# Altium PCB photo_frame-v1.0.PcbDoc (part 1 of 5)
Units mil, origin at the board's own origin, x right, y up, seen from the top; angles counter-clockwise.
Board outline 27716.54 x 14566.93 mil, 2 copper layers (Top Layer, Bottom Layer), stack 61.811 mil thick; 261 components, 231 nets, 1061 pads, 959 vias.
Unrouted connection lines stored in the file: 10.
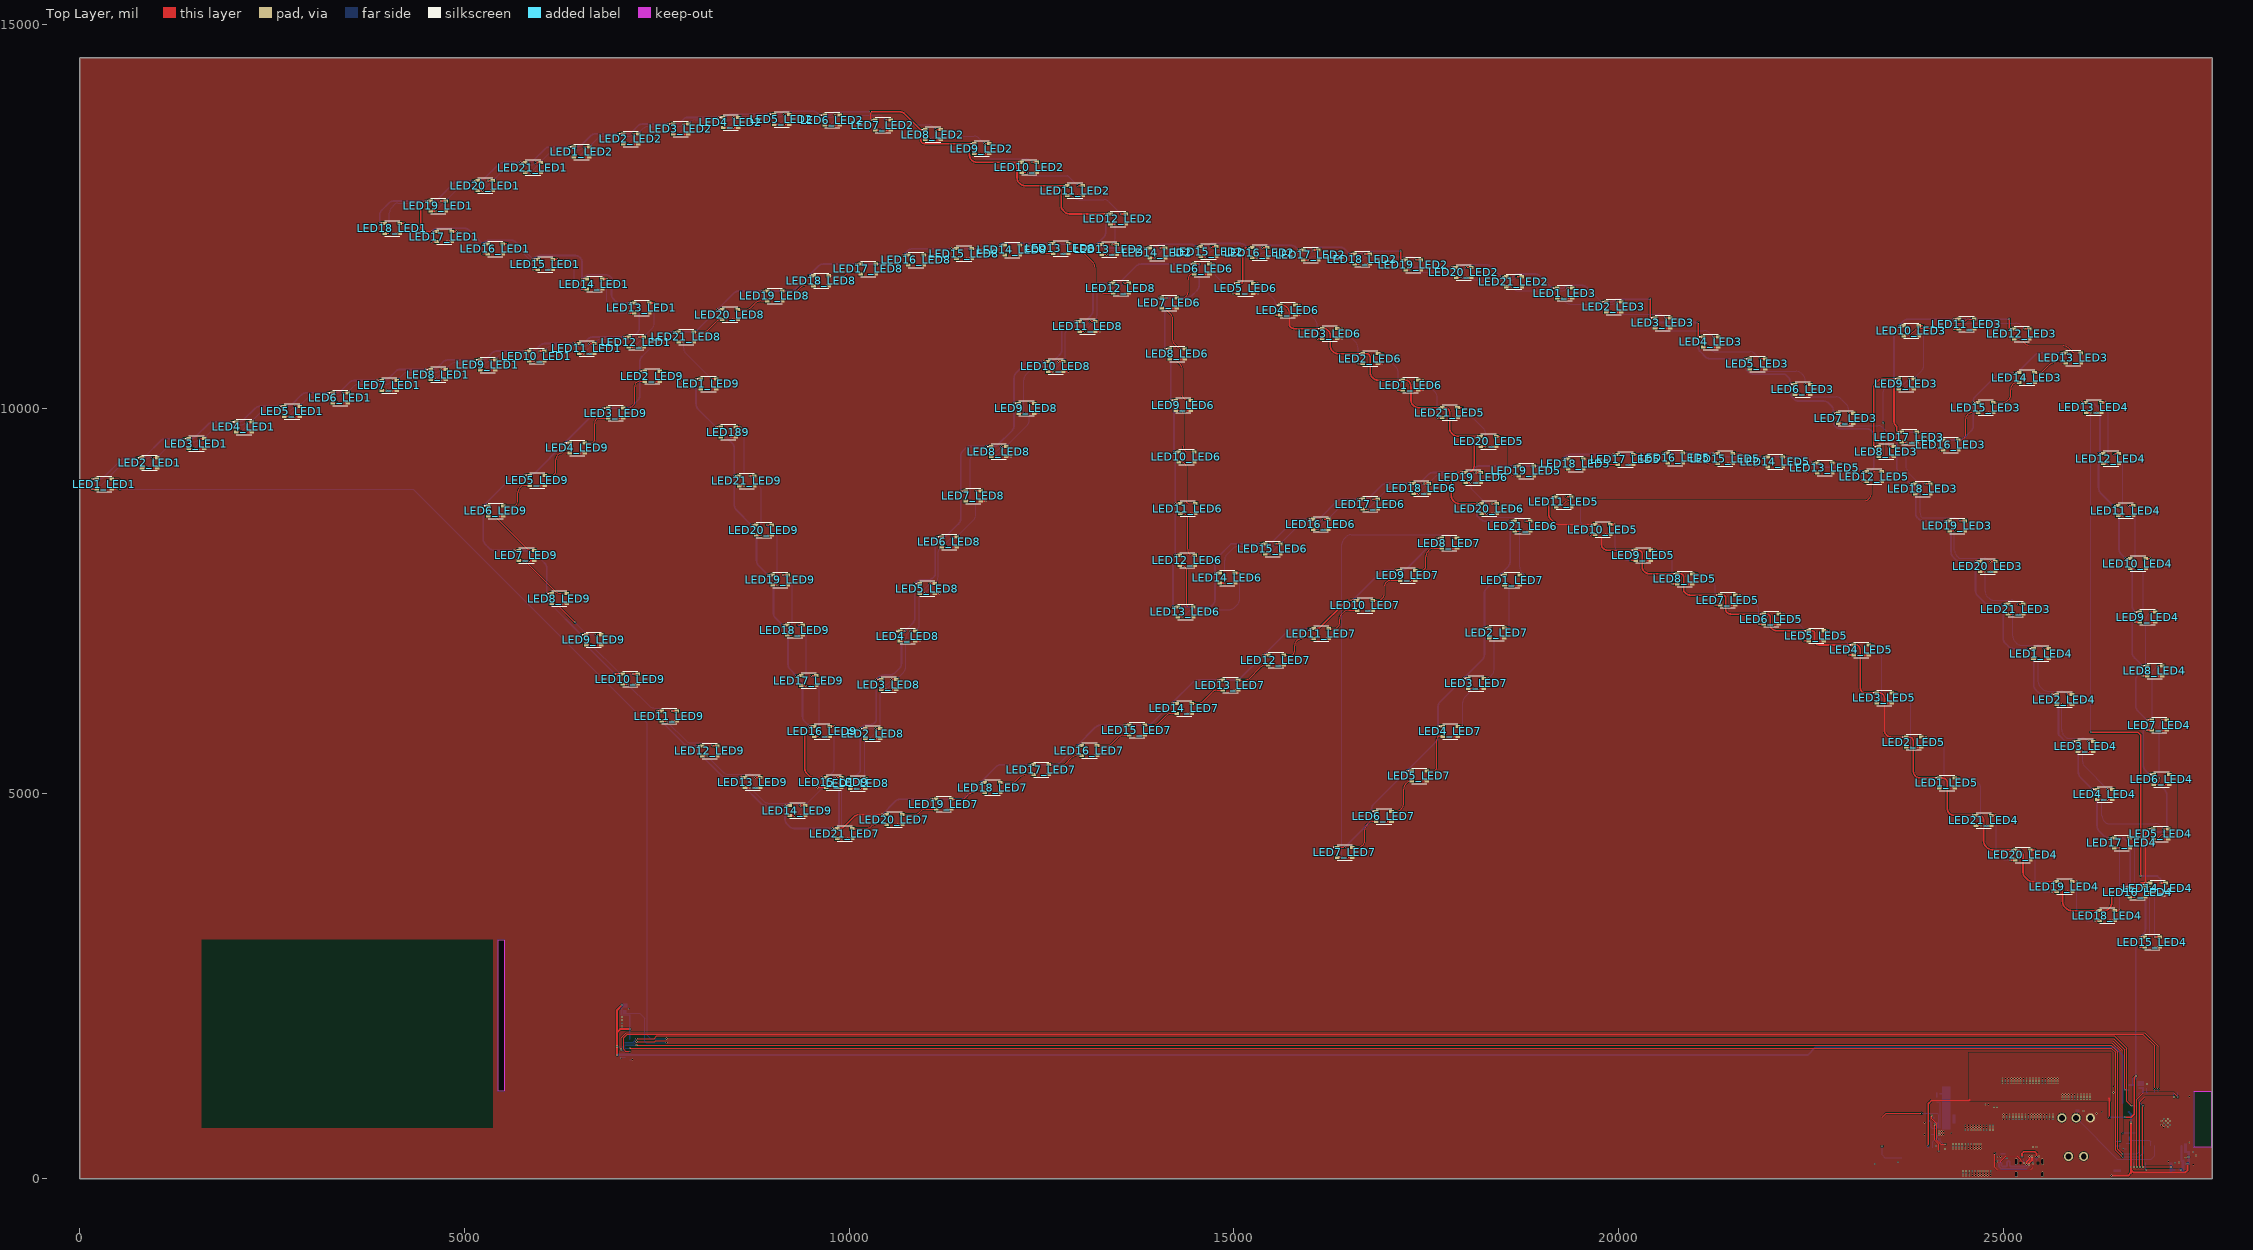
[diagram p0: Top Layer view]
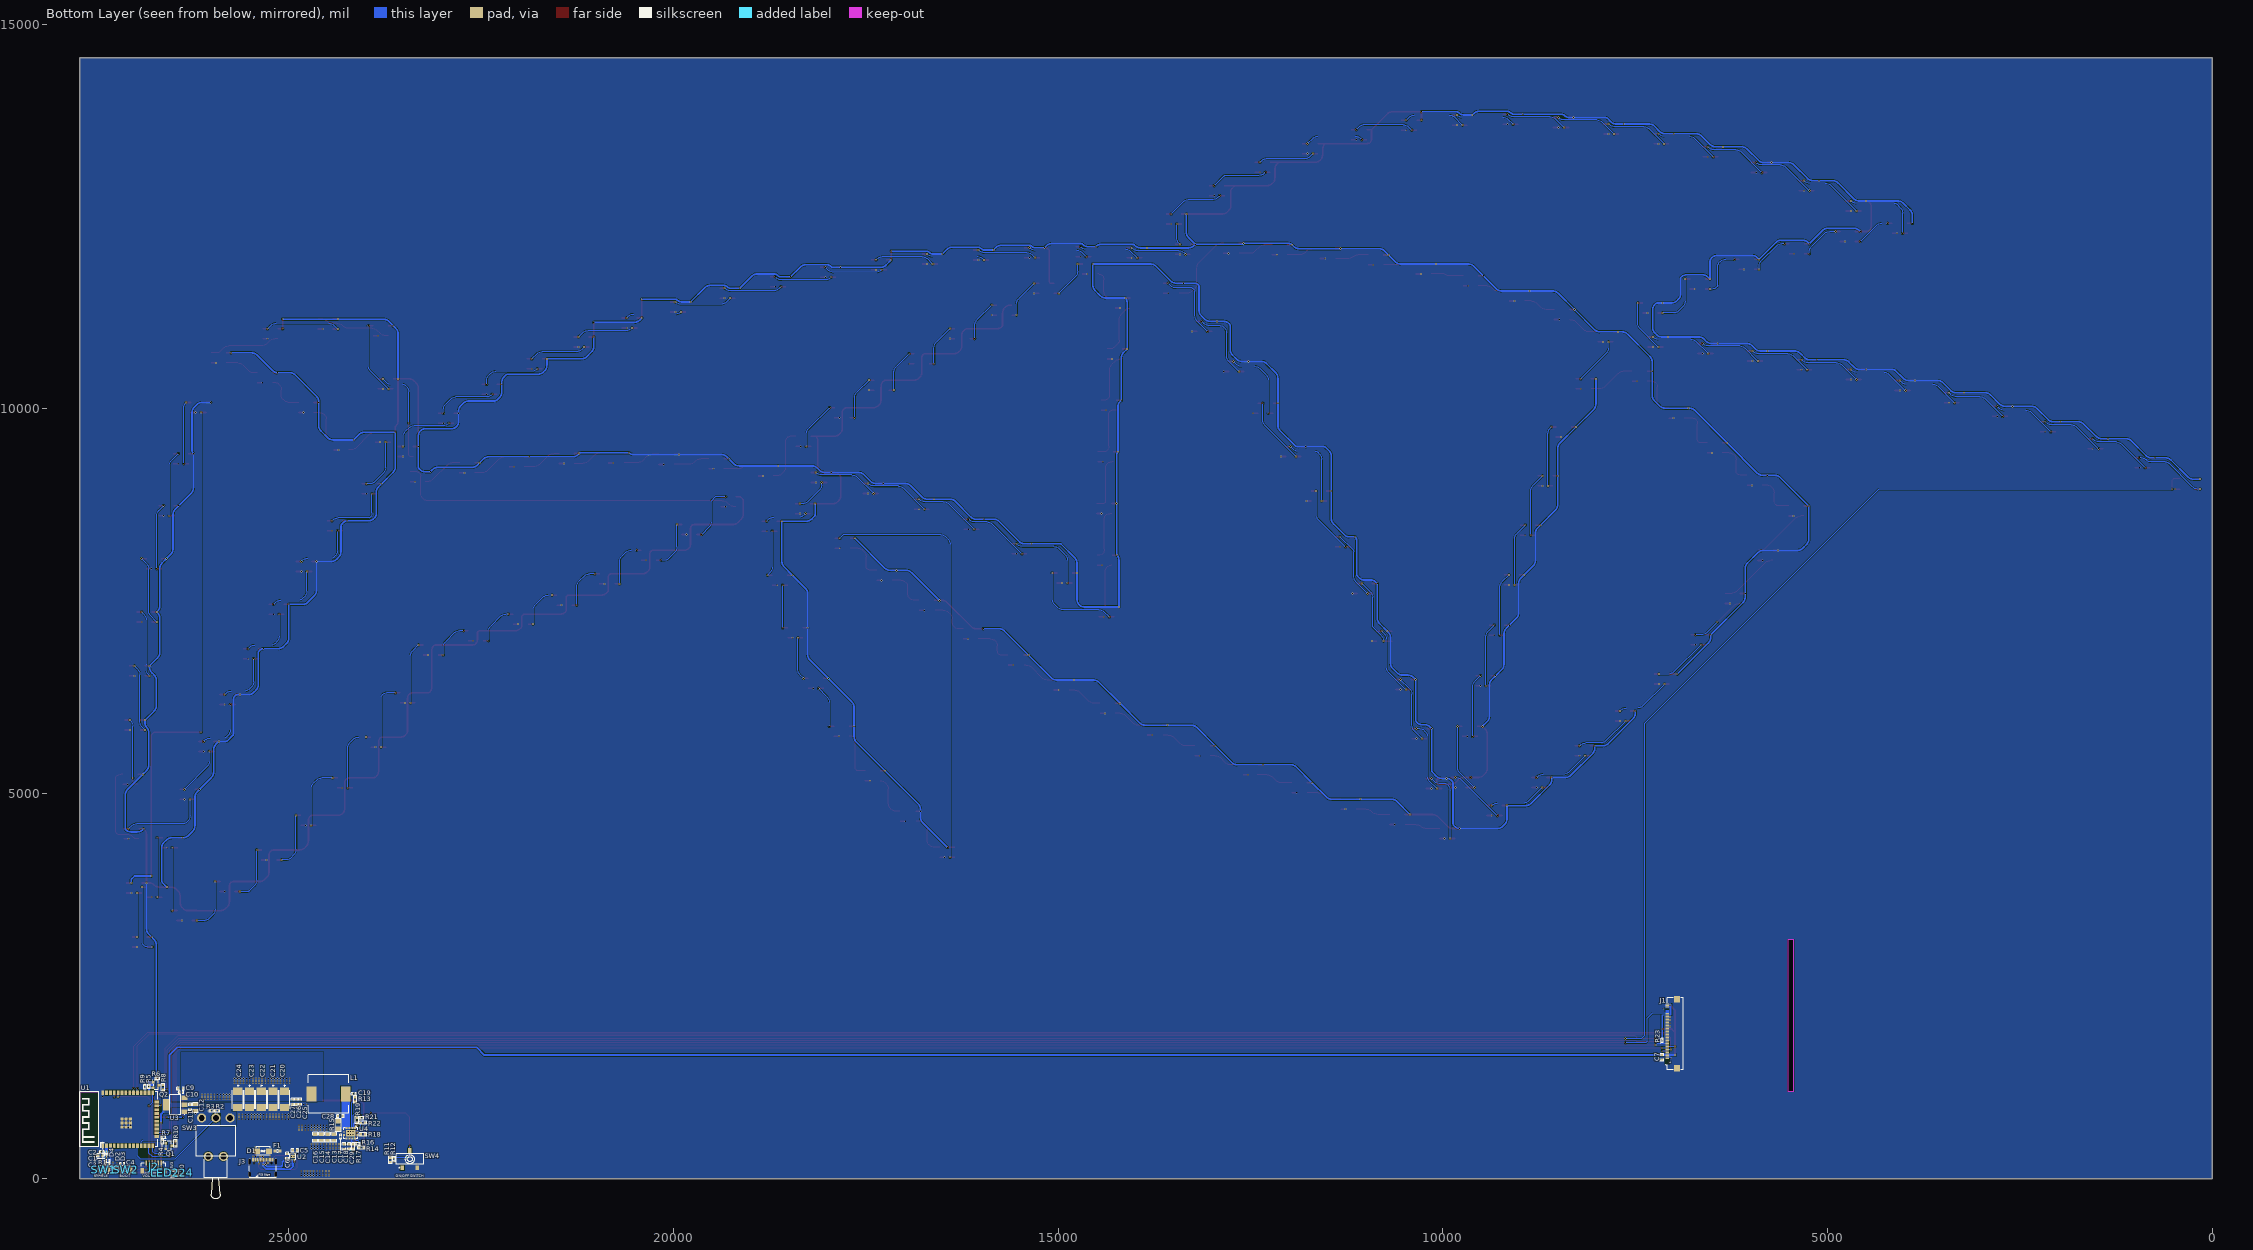
[diagram p1: Bottom Layer view, seen from below]
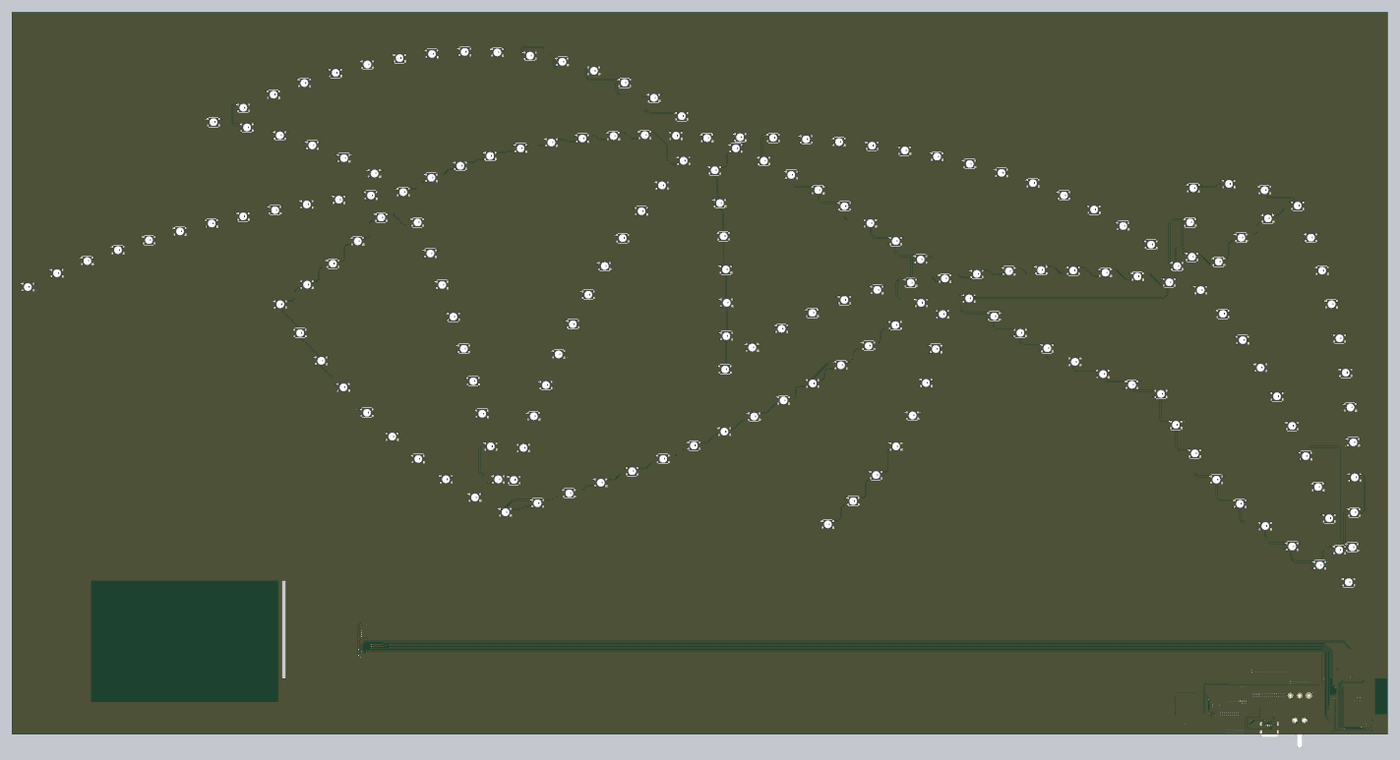
[diagram p5: 3D render of the assembled board from above, using the file's embedded part models]
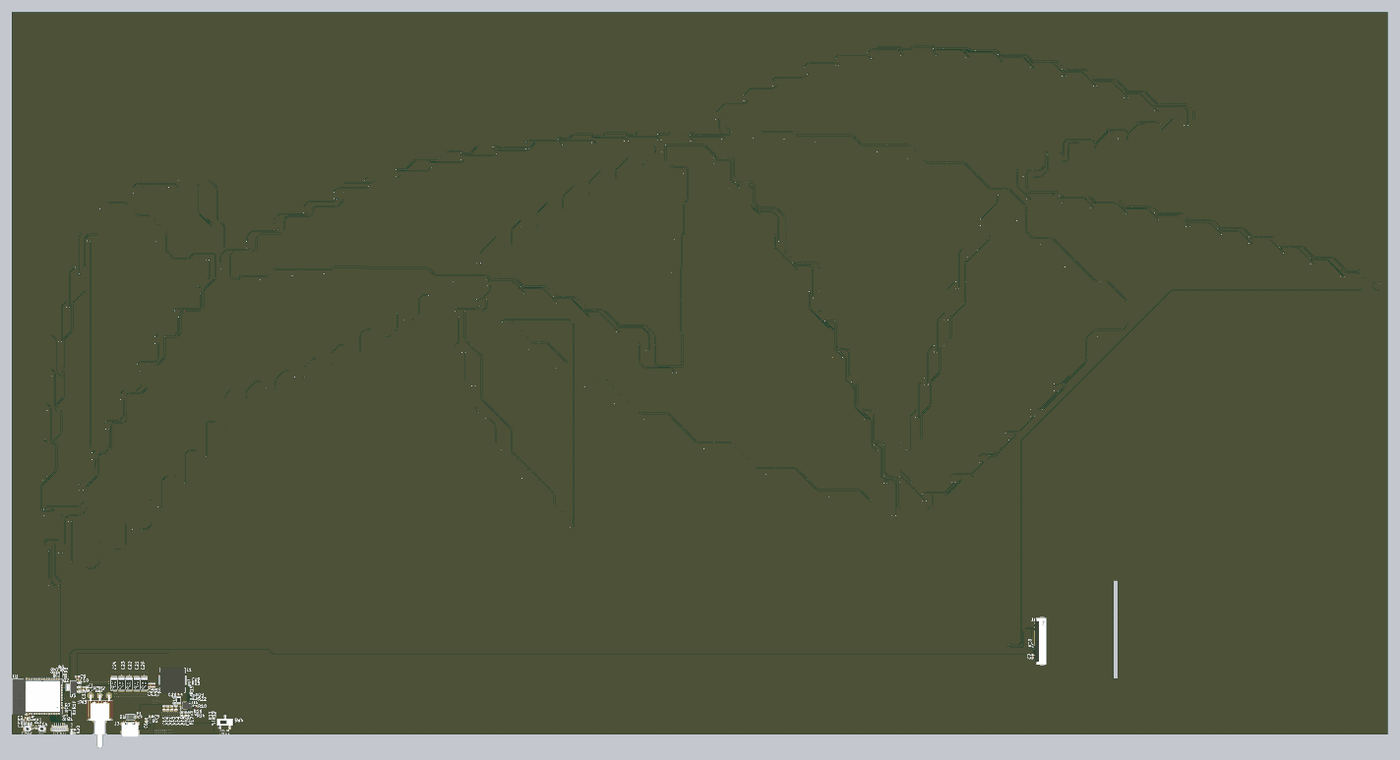
[diagram p6: 3D render of the assembled board from below, using the file's embedded part models]

## Layer stack, top to bottom
Top Solder: solder mask 0.3937, Solder Resist, Dk 3.5
Top Layer: signal copper 1.378
Dielectric 1: dielectric 59.0551, FR-4, Dk 4.8
Bottom Layer: signal copper 1.378
Bottom Solder: solder mask 0.3937, Solder Resist, Dk 3.5

## Board outline
0,0 27716.54,0 27716.54,14566.93 0,14566.93
cut-out: 5440.02,1133.7 5440.02,3102.2 5518.76,3102.2 5518.76,1133.7

## Design rules (kind name [scope] priority, off if disabled: settings)
BoardOutlineClearance [All] p1: gap=0 ignorepadtopadclearanceinfootprint=FALSE except(10: Poly-OutlineEdge)
Clearance [All] p1: gap=7 ignorepadtopadclearanceinfootprint=FALSE except(0: Arc-Hole Track-Hole SMDPad-THPad SMDPad-Hole THPad-Hole Via-Hole Fill-Hole Poly-Hole Region-Hole Text-Hole; 4: Arc-SMDPad Track-SMDPad SMDPad-SMDPad)
DiffPairsRouting [InDifferentialPairClass('USB_DIFF_Lines')] p1: maxlimit=8 minlimit=8 mostfreqgap=8 toplayer_minwidth=8 toplayer_maxwidth=24 toplayer_prefwidth=24 bottomlayer_minwidth=8 bottomlayer_maxwidth=24 bottomlayer_prefwidth=24 impedanceprofiledriven=TRUE impedanceprofileid={633D5728-49A2-474F-B205-5C5DE7246109} impedanceprofilevalue=90.000000 maxuncoupledlength=500
HoleSize [All] p1: absolutevalues=TRUE maxlimit=1000 minlimit=1 maxpercent=80.000 minpercent=20.000
HoleToHoleClearance [All] p1: gap=0 allowstackedmicrovias=TRUE
MatchedLengths "Schematic Matched Net Lengths_1" [InNetClass('USB_DIFF')] p1: tolerance=20 checknetsindiffpair=TRUE checkdiffpairvsdiffpair=FALSE checkxsignals=FALSE checkothers=FALSE
MaxMinImpedance "Schematic Impedance Constraint_1" [InNetClass('USB_DIFF')] p1: minimum=85.00 maximum=95.00
MinimumSolderMaskSliver [All] p1: minsoldermaskwidth=0
PlaneConnect [All] p1: planeconnectstyle=Direct reliefexpansion=20 reliefentries=4 reliefconductorwidth=10 reliefairgap=10
PolygonConnect [All] p1: connectstyle=Direct reliefconductorwidth=10 reliefentries=4 polygonreliefangle="90 Angle" airgapwidth=10
RoutingVias [All] p1: holewidth=11.81 width=23.62 viastyle="Through Hole" minholewidth=11.81 minwidth=23.62 maxholewidth=11.81 maxwidth=23.62
SilkToSilkClearance [All] p1: silktosilkclearance=0
SilkToSolderMaskClearance [IsPad] p1: minsilkscreentomaskgap=0 clearancetoexposedcopper=TRUE
SolderMaskExpansion [All] p1: expansion=4 istentingtop=FALSE
UnRoutedNet [All] p1: checkbadconnections=TRUE
Width [All] p1: maxlimit=100 minlimit=5 preferedwidth=22
22 further rules are at their usual default settings.

## Classes and differential pairs
differential pair class USB_DIFF_Lines: USB_D
channel class LED_Sheet: LED1 LED2 LED3 LED4 LED5 LED6 LED7 LED8 LED9
net class USB_DIFF: USB_D_N USB_D_P
component class U_Power_Sheet: C5 C6 C9 C10 C11 C12 C13 C14 C15 C16 C17 C18 C19 C20 C21 C22 C23 C24 C25 C26 C27 C28 C29 D1 F1 J3 L1 LED224 R11 R12 R13 R14 R15 R16 R17 R18 R19 R20 R21 R22 SW4 U2 U3 U4
component class U_Controller_Sheet: C1 C2 C3 C4 C7 D2 D3 D4 J1 J2 Q1 Q2 R1 R2 R3 R4 R5 R6 R7 R8 R9 R10 R23 SW1 SW2 SW3 U1
component class Top_Sheet: LED189
component class LED9: LED1_LED9 LED2_LED9 LED3_LED9 LED4_LED9 LED5_LED9 LED6_LED9 LED7_LED9 LED8_LED9 LED9_LED9 LED10_LED9 LED11_LED9 LED12_LED9 LED13_LED9 LED14_LED9 LED15_LED9 LED16_LED9 LED17_LED9 LED18_LED9 LED19_LED9 LED20_LED9 LED21_LED9
component class LED8: LED1_LED8 LED2_LED8 LED3_LED8 LED4_LED8 LED5_LED8 LED6_LED8 LED7_LED8 LED8_LED8 LED9_LED8 LED10_LED8 LED11_LED8 LED12_LED8 LED13_LED8 LED14_LED8 LED15_LED8 LED16_LED8 LED17_LED8 LED18_LED8 LED19_LED8 LED20_LED8 LED21_LED8
component class LED7: LED1_LED7 LED2_LED7 LED3_LED7 LED4_LED7 LED5_LED7 LED6_LED7 LED7_LED7 LED8_LED7 LED9_LED7 LED10_LED7 LED11_LED7 LED12_LED7 LED13_LED7 LED14_LED7 LED15_LED7 LED16_LED7 LED17_LED7 LED18_LED7 LED19_LED7 LED20_LED7 LED21_LED7
component class LED6: LED1_LED6 LED2_LED6 LED3_LED6 LED4_LED6 LED5_LED6 LED6_LED6 LED7_LED6 LED8_LED6 LED9_LED6 LED10_LED6 LED11_LED6 LED12_LED6 LED13_LED6 LED14_LED6 LED15_LED6 LED16_LED6 LED17_LED6 LED18_LED6 LED19_LED6 LED20_LED6 LED21_LED6
component class LED5: LED1_LED5 LED2_LED5 LED3_LED5 LED4_LED5 LED5_LED5 LED6_LED5 LED7_LED5 LED8_LED5 LED9_LED5 LED10_LED5 LED11_LED5 LED12_LED5 LED13_LED5 LED14_LED5 LED15_LED5 LED16_LED5 LED17_LED5 LED18_LED5 LED19_LED5 LED20_LED5 LED21_LED5
component class LED4: LED1_LED4 LED2_LED4 LED3_LED4 LED4_LED4 LED5_LED4 LED6_LED4 LED7_LED4 LED8_LED4 LED9_LED4 LED10_LED4 LED11_LED4 LED12_LED4 LED13_LED4 LED14_LED4 LED15_LED4 LED16_LED4 LED17_LED4 LED18_LED4 LED19_LED4 LED20_LED4 LED21_LED4
component class LED3: LED1_LED3 LED2_LED3 LED3_LED3 LED4_LED3 LED5_LED3 LED6_LED3 LED7_LED3 LED8_LED3 LED9_LED3 LED10_LED3 LED11_LED3 LED12_LED3 LED13_LED3 LED14_LED3 LED15_LED3 LED16_LED3 LED17_LED3 LED18_LED3 LED19_LED3 LED20_LED3 LED21_LED3
component class LED2: LED1_LED2 LED2_LED2 LED3_LED2 LED4_LED2 LED5_LED2 LED6_LED2 LED7_LED2 LED8_LED2 LED9_LED2 LED10_LED2 LED11_LED2 LED12_LED2 LED13_LED2 LED14_LED2 LED15_LED2 LED16_LED2 LED17_LED2 LED18_LED2 LED19_LED2 LED20_LED2 LED21_LED2
component class LED1: LED1_LED1 LED2_LED1 LED3_LED1 LED4_LED1 LED5_LED1 LED6_LED1 LED7_LED1 LED8_LED1 LED9_LED1 LED10_LED1 LED11_LED1 LED12_LED1 LED13_LED1 LED14_LED1 LED15_LED1 LED16_LED1 LED17_LED1 LED18_LED1 LED19_LED1 LED20_LED1 LED21_LED1
differential pair USB_D: +USB_D_P -USB_D_N

## Components (designator, comment, footprint, x,y, rotation, side; value= is the part's Value field where it differs from the comment)
C1 "10uF" Cap-0603 27443.62,298 r180 bottom
C2 "100nF" Cap-0402 27425.62,342.89 r180 bottom
C3 "100nF" Cap-0402 27350,231 r180 bottom
C4 "100nF" Cap-0402 27161,188 r0 bottom
C5 "10uF" Cap-0603 24916.12,365.26 r0 bottom
C6 "20nF" Cap-0603 25017.12,293.26 r90 bottom
C7 "1uF" CAP-0603 7153,1575 r270 bottom
C9 "10uF" Cap-0603 26402.26,1166.88 r180 bottom
C10 "100nF" Cap-0402 26393.76,1117.88 r180 bottom
C11 "10uF" Cap-0603 26278.26,927.88 r90 bottom
C12 "22uF" Cap-0805 26209.26,920.88 r90 bottom
C13 "22uF" Cap-0805 24410.12,535.26 r270 bottom
C14 "22uF" Cap-0805 24491.12,535.26 r270 bottom
C15 "22uF" Cap-0805 24572.12,535.26 r270 bottom
C16 "22uF" Cap-0805 24653.12,535.26 r270 bottom
C17 "2.2nF" Cap-0402 24322.12,541.26 r90 bottom
C18 "2.2uF" CAP-0603 24281,415 r90 bottom
C19 "100nF" Cap-0402 24151.62,1100.26 r0 bottom
C20 "68uF" Case-C 25051,1028 r270 bottom
C21 "68uF" Case-C 25203.25,1028 r270 bottom
C22 "68uF" Case-C 25355.5,1028 r270 bottom
C23 "68uF" Case-C 25507.75,1028 r270 bottom
C24 "68uF" Case-C 25660,1028 r270 bottom
C25 "10uF" Cap-0603 24848,997 r90 bottom
C26 "10uF" Cap-0603 24898,997 r90 bottom
C27 "10uF" Cap-0603 24946,997 r90 bottom
C28 "470pF" Cap-0603 24327.12,808.26 r180 bottom
C29 "2.2uF" CAP-0603 24212.12,416.26 r270 bottom
D1 "SMAJ40CA" "SMA Bi Directional" 25330.86,356.26 r180 bottom
D2 "ESD5Z3.3C" "SOD-523 (Bi-Directional)" 27282.12,145.78 r270 bottom
D3 "ESD5Z3.3C" "SOD-523 (Bi-Directional)" 27229.12,143.78 r270 bottom
D4 "ESD5Z3.3C" "SOD-523 (Bi-Directional)" 27365.38,320.63 r90 bottom
F1 "CF06V2T3R15" Fuse-0603 25144.65,356.26 r180 bottom
J1 "AFC24-S40FIC-00" AFC24-S40FIC-00 7022.65,1881.73 r90 bottom
J2 "Voltlink Target" "Voltlink Target" 26754.06,152.56 r0 bottom
J3 "TYPE-C-31-M-12" TYPE-C-31-M-12_ 25335.61,149.1 r180 bottom
L1 "2.2uH" BCIH1367-2R2M 24479.57,1099.26 r0 bottom
LED1_LED1 "WS2812B-B/W" WS2812B-B/W 322.36,9023.43 r0 top (schematic designator LED1)
LED1_LED2 "WS2812B-B/W" WS2812B-B/W 6523.12,13341.26 r0 top (schematic designator LED1)
LED1_LED3 "WS2812B-B/W" WS2812B-B/W 19298.12,11505.26 r0 top (schematic designator LED1)
LED1_LED4 "WS2812B-B/W" WS2812B-B/W 25489.55,6820.4 r0 top (schematic designator LED1)
LED1_LED5 "WS2812B-B/W" WS2812B-B/W 24266.79,5141.48 r0 top (schematic designator LED1)
LED1_LED6 "WS2812B-B/W" WS2812B-B/W 17295.46,10310.18 r0 top (schematic designator LED1)
LED1_LED7 "WS2812B-B/W" WS2812B-B/W 18615.12,7775.26 r0 top (schematic designator LED1)
LED1_LED8 "WS2812B-B/W" WS2812B-B/W 10114.12,5134.26 r0 top (schematic designator LED1)
LED1_LED9 "WS2812B-B/W" WS2812B-B/W 8173.12,10326.26 r0 top (schematic designator LED1)
LED2_LED1 "WS2812B-B/W" WS2812B-B/W 910.12,9301.26 r0 top (schematic designator LED2)
LED2_LED2 "WS2812B-B/W" WS2812B-B/W 7162.12,13510.26 r0 top (schematic designator LED2)
LED2_LED3 "WS2812B-B/W" WS2812B-B/W 19938.12,11326.26 r0 top (schematic designator LED2)
LED2_LED4 "WS2812B-B/W" WS2812B-B/W 25792.99,6224.16 r0 top (schematic designator LED2)
LED2_LED5 "WS2812B-B/W" WS2812B-B/W 23833.12,5671.26 r0 top (schematic designator LED2)
LED2_LED6 "WS2812B-B/W" WS2812B-B/W 16774.44,10653.06 r0 top (schematic designator LED2)
LED2_LED7 "WS2812B-B/W" WS2812B-B/W 18417.12,7091.26 r0 top (schematic designator LED2)
LED2_LED8 "WS2812B-B/W" WS2812B-B/W 10307.12,5781.26 r0 top (schematic designator LED2)
LED2_LED9 "WS2812B-B/W" WS2812B-B/W 7441.12,10425.26 r0 top (schematic designator LED2)
LED3_LED1 "WS2812B-B/W" WS2812B-B/W 1519.32,9549.31 r0 top (schematic designator LED3)
LED3_LED2 "WS2812B-B/W" WS2812B-B/W 7812.12,13638.26 r0 top (schematic designator LED3)
LED3_LED3 "WS2812B-B/W" WS2812B-B/W 20571.12,11118.26 r0 top (schematic designator LED3)
LED3_LED4 "WS2812B-B/W" WS2812B-B/W 26067.47,5615.28 r0 top (schematic designator LED3)
LED3_LED5 "WS2812B-B/W" WS2812B-B/W 23452.12,6246.26 r0 top (schematic designator LED3)
LED3_LED6 "WS2812B-B/W" WS2812B-B/W 16245.42,10978.71 r0 top (schematic designator LED3)
LED3_LED7 "WS2812B-B/W" WS2812B-B/W 18147.12,6434.26 r0 top (schematic designator LED3)
LED3_LED8 "WS2812B-B/W" WS2812B-B/W 10516.12,6419.26 r0 top (schematic designator LED3)
LED3_LED9 "WS2812B-B/W" WS2812B-B/W 6968.12,9946.26 r0 top (schematic designator LED3)
LED4_LED1 "WS2812B-B/W" WS2812B-B/W 2137.12,9768.26 r0 top (schematic designator LED4)
LED4_LED2 "WS2812B-B/W" WS2812B-B/W 8464.12,13723.26 r0 top (schematic designator LED4)
LED4_LED3 "WS2812B-B/W" WS2812B-B/W 21195.12,10871.26 r0 top (schematic designator LED4)
LED4_LED4 "WS2812B-B/W" WS2812B-B/W 26316.56,4992.45 r0 top (schematic designator LED4)
LED4_LED5 "WS2812B-B/W" WS2812B-B/W 23151.12,6869.26 r0 top (schematic designator LED4)
LED4_LED6 "WS2812B-B/W" WS2812B-B/W 15702.43,11284.51 r0 top (schematic designator LED4)
LED4_LED7 "WS2812B-B/W" WS2812B-B/W 17813.12,5811.26 r0 top (schematic designator LED4)
LED4_LED8 "WS2812B-B/W" WS2812B-B/W 10760.12,7048.26 r0 top (schematic designator LED4)
LED4_LED9 "WS2812B-B/W" WS2812B-B/W 6467.12,9494.26 r0 top (schematic designator LED4)
LED5_LED1 "WS2812B-B/W" WS2812B-B/W 2761.12,9969.26 r0 top (schematic designator LED5)
LED5_LED2 "WS2812B-B/W" WS2812B-B/W 9123.12,13764.26 r0 top (schematic designator LED5)
LED5_LED3 "WS2812B-B/W" WS2812B-B/W 21804.12,10586.26 r0 top (schematic designator LED5)
LED5_LED4 "WS2812B-B/W" WS2812B-B/W 27045.39,4479.34 r0 top (schematic designator LED5)
LED5_LED5 "WS2812B-B/W" WS2812B-B/W 22566.12,7053.26 r0 top (schematic designator LED5)
LED5_LED6 "WS2812B-B/W" WS2812B-B/W 15151.51,11567.52 r0 top (schematic designator LED5)
LED5_LED7 "WS2812B-B/W" WS2812B-B/W 17410.12,5233.26 r0 top (schematic designator LED5)
LED5_LED8 "WS2812B-B/W" WS2812B-B/W 11015.12,7666.26 r0 top (schematic designator LED5)
LED5_LED9 "WS2812B-B/W" WS2812B-B/W 5947.12,9072.26 r0 top (schematic designator LED5)
LED6_LED1 "WS2812B-B/W" WS2812B-B/W 3388.12,10145.26 r0 top (schematic designator LED6)
LED6_LED2 "WS2812B-B/W" WS2812B-B/W 9781.12,13753.26 r0 top (schematic designator LED6)
LED6_LED3 "WS2812B-B/W" WS2812B-B/W 22390.19,10255.63 r0 top (schematic designator LED6)
LED6_LED4 "WS2812B-B/W" WS2812B-B/W 27054.64,5186.71 r0 top (schematic designator LED6)
LED6_LED5 "WS2812B-B/W" WS2812B-B/W 21983.54,7269.3 r0 top (schematic designator LED6)
LED6_LED6 "WS2812B-B/W" WS2812B-B/W 14585.25,11819.44 r0 top (schematic designator LED6)
LED6_LED7 "WS2812B-B/W" WS2812B-B/W 16950.12,4707.26 r0 top (schematic designator LED6)
LED6_LED8 "WS2812B-B/W" WS2812B-B/W 11302.12,8274.26 r0 top (schematic designator LED6)
LED6_LED9 "WS2812B-B/W" WS2812B-B/W 5407.12,8675.26 r0 top (schematic designator LED6)
LED7_LED1 "WS2812B-B/W" WS2812B-B/W 4026.12,10305.26 r0 top (schematic designator LED7)
LED7_LED2 "WS2812B-B/W" WS2812B-B/W 10440.12,13688.26 r0 top (schematic designator LED7)
LED7_LED3 "WS2812B-B/W" WS2812B-B/W 22952.74,9879.47 r0 top (schematic designator LED7)
LED7_LED4 "WS2812B-B/W" WS2812B-B/W 27026.54,5892.51 r0 top (schematic designator LED7)
LED7_LED5 "WS2812B-B/W" WS2812B-B/W 21417.12,7516.26 r0 top (schematic designator LED7)
LED7_LED6 "WS2812B-B/W" WS2812B-B/W 14161.34,11377.41 r0 top (schematic designator LED7)
LED7_LED7 "WS2812B-B/W" WS2812B-B/W 16440.12,4239.26 r0 top (schematic designator LED7)
LED7_LED8 "WS2812B-B/W" WS2812B-B/W 11612.12,8869.26 r0 top (schematic designator LED7)
LED7_LED9 "WS2812B-B/W" WS2812B-B/W 5808.12,8096.26 r0 top (schematic designator LED7)
LED8_LED1 "WS2812B-B/W" WS2812B-B/W 4661.12,10447.26 r0 top (schematic designator LED8)
LED8_LED2 "WS2812B-B/W" WS2812B-B/W 11090.12,13565.26 r0 top (schematic designator LED8)
LED8_LED3 "WS2812B-B/W" WS2812B-B/W 23476.08,9446.45 r0 top (schematic designator LED8)
LED8_LED4 "WS2812B-B/W" WS2812B-B/W 26968.3,6596.58 r0 top (schematic designator LED8)
LED8_LED5 "WS2812B-B/W" WS2812B-B/W 20860.12,7792.26 r0 top (schematic designator LED8)
LED8_LED6 "WS2812B-B/W" WS2812B-B/W 14265.12,10715.26 r0 top (schematic designator LED8)
LED8_LED7 "WS2812B-B/W" WS2812B-B/W 17801.12,8256.26 r0 top (schematic designator LED8)
LED8_LED8 "WS2812B-B/W" WS2812B-B/W 11944.12,9446.26 r0 top (schematic designator LED8)
LED8_LED9 "WS2812B-B/W" WS2812B-B/W 6233.12,7537.26 r0 top (schematic designator LED8)
LED9_LED1 "WS2812B-B/W" WS2812B-B/W 5303.66,10573.94 r0 top (schematic designator LED9)
LED9_LED2 "WS2812B-B/W" WS2812B-B/W 11725.12,13383.26 r0 top (schematic designator LED9)
LED9_LED3 "WS2812B-B/W" WS2812B-B/W 23738.69,10326.15 r0 top (schematic designator LED9)
LED9_LED4 "WS2812B-B/W" WS2812B-B/W 26872.98,7296.5 r0 top (schematic designator LED9)
LED9_LED5 "WS2812B-B/W" WS2812B-B/W 20318.12,8099.26 r0 top (schematic designator LED9)
LED9_LED6 "WS2812B-B/W" WS2812B-B/W 14340.69,10048.22 r0 top (schematic designator LED9)
LED9_LED7 "WS2812B-B/W" WS2812B-B/W 17260.12,7838.26 r0 top (schematic designator LED9)
LED9_LED8 "WS2812B-B/W" WS2812B-B/W 12305.12,10009.26 r0 top (schematic designator LED9)
LED9_LED9 "WS2812B-B/W" WS2812B-B/W 6681.12,7001.26 r0 top (schematic designator LED9)
LED10_LED1 "WS2812B-B/W" WS2812B-B/W 5943.12,10688.26 r0 top (schematic designator LED10)
LED10_LED2 "WS2812B-B/W" WS2812B-B/W 12343.12,13141.26 r0 top (schematic designator LED10)
LED10_LED3 "WS2812B-B/W" WS2812B-B/W 23802.3,11016.71 r0 top (schematic designator LED10)
LED10_LED4 "WS2812B-B/W" WS2812B-B/W 26748.75,7990.39 r0 top (schematic designator LED10)
LED10_LED5 "WS2812B-B/W" WS2812B-B/W 19792.12,8433.26 r0 top (schematic designator LED10)
LED10_LED6 "WS2812B-B/W" WS2812B-B/W 14384.12,9378.26 r0 top (schematic designator LED10)
LED10_LED7 "WS2812B-B/W" WS2812B-B/W 16704.12,7448.26 r0 top (schematic designator LED10)
LED10_LED8 "WS2812B-B/W" WS2812B-B/W 12686.12,10552.26 r0 top (schematic designator LED10)
LED10_LED9 "WS2812B-B/W" WS2812B-B/W 7156.12,6490.26 r0 top (schematic designator LED10)
LED11_LED1 "WS2812B-B/W" WS2812B-B/W 6589.12,10786.26 r0 top (schematic designator LED11)
LED11_LED2 "WS2812B-B/W" WS2812B-B/W 12936.12,12837.26 r0 top (schematic designator LED11)
LED11_LED3 "WS2812B-B/W" WS2812B-B/W 24521.1,11103.14 r0 top (schematic designator LED11)
LED11_LED4 "WS2812B-B/W" WS2812B-B/W 26588.12,8678.38 r0 top (schematic designator LED11)
LED11_LED5 "WS2812B-B/W" WS2812B-B/W 19285.12,8794.26 r0 top (schematic designator LED11)
LED11_LED6 "WS2812B-B/W" WS2812B-B/W 14401.12,8706.26 r0 top (schematic designator LED11)
LED11_LED7 "WS2812B-B/W" WS2812B-B/W 16134.12,7080.26 r0 top (schematic designator LED11)
LED11_LED8 "WS2812B-B/W" WS2812B-B/W 13098.12,11073.26 r0 top (schematic designator LED11)
LED11_LED9 "WS2812B-B/W" WS2812B-B/W 7662.12,6009.26 r0 top (schematic designator LED11)
LED12_LED1 "WS2812B-B/W" WS2812B-B/W 7235.41,10870.05 r0 top (schematic designator LED12)
LED12_LED2 "WS2812B-B/W" WS2812B-B/W 13495.12,12469.26 r0 top (schematic designator LED12)
LED12_LED3 "WS2812B-B/W" WS2812B-B/W 25238.22,10976.96 r0 top (schematic designator LED12)
LED12_LED4 "WS2812B-B/W" WS2812B-B/W 26397.81,9353.82 r0 top (schematic designator LED12)
LED12_LED5 "WS2812B-B/W" WS2812B-B/W 23319.69,9120.3 r0 top (schematic designator LED12)
LED12_LED6 "WS2812B-B/W" WS2812B-B/W 14394.69,8034.3 r0 top (schematic designator LED12)
LED12_LED7 "WS2812B-B/W" WS2812B-B/W 15547.12,6737.26 r0 top (schematic designator LED12)
LED12_LED8 "WS2812B-B/W" WS2812B-B/W 13533.12,11569.26 r0 top (schematic designator LED12)
LED12_LED9 "WS2812B-B/W" WS2812B-B/W 8188.12,5558.26 r0 top (schematic designator LED12)
LED13_LED1 "WS2812B-B/W" WS2812B-B/W 7305.77,11312.95 r0 top (schematic designator LED13)
LED13_LED2 "WS2812B-B/W" WS2812B-B/W 13380.12,12074.26 r0 top (schematic designator LED13)
LED13_LED3 "WS2812B-B/W" WS2812B-B/W 25906.12,10664.18 r0 top (schematic designator LED13)
LED13_LED4 "WS2812B-B/W" WS2812B-B/W 26172.4,10019.6 r0 top (schematic designator LED13)
LED13_LED5 "WS2812B-B/W" WS2812B-B/W 22679.4,9235.05 r0 top (schematic designator LED13)
LED13_LED6 "WS2812B-B/W" WS2812B-B/W 14371.12,7363.26 r0 top (schematic designator LED13)
LED13_LED7 "WS2812B-B/W" WS2812B-B/W 14955.54,6413.22 r0 top (schematic designator LED13)
LED13_LED8 "WS2812B-B/W" WS2812B-B/W 12751.69,12087.3 r0 top (schematic designator LED13)
LED13_LED9 "WS2812B-B/W" WS2812B-B/W 8746.12,5147.26 r0 top (schematic designator LED13)
LED14_LED1 "WS2812B-B/W" WS2812B-B/W 6691.25,11622.97 r0 top (schematic designator LED14)
LED14_LED2 "WS2812B-B/W" WS2812B-B/W 14006.69,12028.22 r0 top (schematic designator LED14)
LED14_LED3 "WS2812B-B/W" WS2812B-B/W 25305.57,10406.25 r0 top (schematic designator LED14)
LED14_LED4 "WS2812B-B/W" WS2812B-B/W 27007.54,3774.82 r0 top (schematic designator LED14)
LED14_LED5 "WS2812B-B/W" WS2812B-B/W 22033.38,9314.05 r0 top (schematic designator LED14)
LED14_LED6 "WS2812B-B/W" WS2812B-B/W 14916.12,7804.26 r0 top (schematic designator LED14)
LED14_LED7 "WS2812B-B/W" WS2812B-B/W 14356.12,6109.26 r0 top (schematic designator LED14)
LED14_LED8 "WS2812B-B/W" WS2812B-B/W 12122.12,12068.26 r0 top (schematic designator LED14)
LED14_LED9 "WS2812B-B/W" WS2812B-B/W 9329.12,4781.26 r0 top (schematic designator LED14)
LED15_LED1 "WS2812B-B/W" WS2812B-B/W 6053.51,11879.16 r0 top (schematic designator LED15)
LED15_LED2 "WS2812B-B/W" WS2812B-B/W 14671.09,12043.76 r0 top (schematic designator LED15)
LED15_LED3 "WS2812B-B/W" WS2812B-B/W 24769.68,10018.24 r0 top (schematic designator LED15)
LED15_LED4 "WS2812B-B/W" WS2812B-B/W 26932.12,3073.26 r0 top (schematic designator LED15)
LED15_LED5 "WS2812B-B/W" WS2812B-B/W 21385.43,9356.26 r0 top (schematic designator LED15)
LED15_LED6 "WS2812B-B/W" WS2812B-B/W 15506.12,8183.26 r0 top (schematic designator LED15)
LED15_LED7 "WS2812B-B/W" WS2812B-B/W 13741.12,5827.26 r0 top (schematic designator LED15)
LED15_LED8 "WS2812B-B/W" WS2812B-B/W 11494.12,12019.26 r0 top (schematic designator LED15)
LED15_LED9 "WS2812B-B/W" WS2812B-B/W 9799.78,5146.77 r0 top (schematic designator LED15)
LED16_LED1 "WS2812B-B/W" WS2812B-B/W 5400.22,12081.77 r0 top (schematic designator LED16)
LED16_LED2 "WS2812B-B/W" WS2812B-B/W 15337.82,12031.26 r0 top (schematic designator LED16)
LED16_LED3 "WS2812B-B/W" WS2812B-B/W 24314.7,9533.16 r0 top (schematic designator LED16)
LED16_LED4 "WS2812B-B/W" WS2812B-B/W 26743.05,3722.03 r0 top (schematic designator LED16)
LED16_LED5 "WS2812B-B/W" WS2812B-B/W 20736.77,9365.86 r0 top (schematic designator LED16)
LED16_LED6 "WS2812B-B/W" WS2812B-B/W 16127.12,8502.26 r0 top (schematic designator LED16)
LED16_LED7 "WS2812B-B/W" WS2812B-B/W 13123.12,5559.26 r0 top (schematic designator LED16)
LED16_LED8 "WS2812B-B/W" WS2812B-B/W 10869.54,11937.22 r0 top (schematic designator LED16)
LED16_LED9 "WS2812B-B/W" WS2812B-B/W 9648.41,5810.95 r0 top (schematic designator LED16)
LED17_LED1 "WS2812B-B/W" WS2812B-B/W 4738.27,12240.88 r0 top (schematic designator LED17)
LED17_LED2 "WS2812B-B/W" WS2812B-B/W 16000.9,12001.76 r0 top (schematic designator LED17)
LED17_LED3 "WS2812B-B/W" WS2812B-B/W 23775.18,9633.98 r0 top (schematic designator LED17)
LED17_LED4 "WS2812B-B/W" WS2812B-B/W 26539.98,4362.4 r0 top (schematic designator LED17)
LED17_LED5 "WS2812B-B/W" WS2812B-B/W 20089.8,9343.74 r0 top (schematic designator LED17)
LED17_LED6 "WS2812B-B/W" WS2812B-B/W 16773.12,8763.26 r0 top (schematic designator LED17)
LED17_LED7 "WS2812B-B/W" WS2812B-B/W 12497.12,5312.26 r0 top (schematic designator LED17)
LED17_LED8 "WS2812B-B/W" WS2812B-B/W 10250.12,11819.26 r0 top (schematic designator LED17)
LED17_LED9 "WS2812B-B/W" WS2812B-B/W 9476.69,6469.3 r0 top (schematic designator LED17)
LED18_LED1 "WS2812B-B/W" WS2812B-B/W 4061.79,12348.01 r0 top (schematic designator LED18)
LED18_LED2 "WS2812B-B/W" WS2812B-B/W 16666.52,11948.37 r0 top (schematic designator LED18)
LED18_LED3 "WS2812B-B/W" WS2812B-B/W 23951.87,8962.93 r0 top (schematic designator LED18)
LED18_LED4 "WS2812B-B/W" WS2812B-B/W 26351.13,3416.92 r0 top (schematic designator LED18)
LED18_LED5 "WS2812B-B/W" WS2812B-B/W 19440.88,9287.71 r0 top (schematic designator LED18)
LED18_LED6 "WS2812B-B/W" WS2812B-B/W 17434.12,8967.26 r0 top (schematic designator LED18)
LED18_LED7 "WS2812B-B/W" WS2812B-B/W 11864.12,5079.26 r0 top (schematic designator LED18)
LED18_LED8 "WS2812B-B/W" WS2812B-B/W 9636.12,11666.26 r0 top (schematic designator LED18)
LED18_LED9 "WS2812B-B/W" WS2812B-B/W 9297.12,7125.26 r0 top (schematic designator LED18)
LED19_LED1 "WS2812B-B/W" WS2812B-B/W 4663.1,12638.23 r0 top (schematic designator LED19)
LED19_LED2 "WS2812B-B/W" WS2812B-B/W 17329.59,11873.03 r0 top (schematic designator LED19)
LED19_LED3 "WS2812B-B/W" WS2812B-B/W 24399.76,8482.21 r0 top (schematic designator LED19)
LED19_LED4 "WS2812B-B/W" WS2812B-B/W 25793.63,3793.95 r0 top (schematic designator LED19)
LED19_LED5 "WS2812B-B/W" WS2812B-B/W 18799.26,9195.12 r0 top (schematic designator LED19)
LED19_LED6 "WS2812B-B/W" WS2812B-B/W 18109.12,9110.26 r0 top (schematic designator LED19)
LED19_LED7 "WS2812B-B/W" WS2812B-B/W 11230.12,4865.26 r0 top (schematic designator LED19)
LED19_LED8 "WS2812B-B/W" WS2812B-B/W 9035.12,11468.26 r0 top (schematic designator LED19)
LED19_LED9 "WS2812B-B/W" WS2812B-B/W 9105.12,7779.26 r0 top (schematic designator LED19)
LED20_LED1 "WS2812B-B/W" WS2812B-B/W 5273.4,12902.02 r0 top (schematic designator LED20)
LED20_LED2 "WS2812B-B/W" WS2812B-B/W 17989.22,11775.98 r0 top (schematic designator LED20)
LED20_LED3 "WS2812B-B/W" WS2812B-B/W 24798.35,7953.91 r0 top (schematic designator LED20)
LED20_LED4 "WS2812B-B/W" WS2812B-B/W 25253.2,4205.27 r0 top (schematic designator LED20)
LED20_LED5 "WS2812B-B/W" WS2812B-B/W 18309.54,9579.3 r0 top (schematic designator LED20)
LED20_LED6 "WS2812B-B/W" WS2812B-B/W 18319.12,8705.26 r0 top (schematic designator LED20)
LED20_LED7 "WS2812B-B/W" WS2812B-B/W 10590.12,4665.26 r0 top (schematic designator LED20)
LED20_LED8 "WS2812B-B/W" WS2812B-B/W 8452.12,11227.26 r0 top (schematic designator LED20)
LED20_LED9 "WS2812B-B/W" WS2812B-B/W 8894.12,8425.26 r0 top (schematic designator LED20)
LED21_LED1 "WS2812B-B/W" WS2812B-B/W 5892.12,13137.26 r0 top (schematic designator LED21)
LED21_LED2 "WS2812B-B/W" WS2812B-B/W 18639.69,11653.22 r0 top (schematic designator LED21)
LED21_LED3 "WS2812B-B/W" WS2812B-B/W 25158.28,7398 r0 top (schematic designator LED21)
LED21_LED4 "WS2812B-B/W" WS2812B-B/W 24742.42,4654.01 r0 top (schematic designator LED21)
LED21_LED5 "WS2812B-B/W" WS2812B-B/W 17807.4,9952.04 r0 top (schematic designator LED21)
LED21_LED6 "WS2812B-B/W" WS2812B-B/W 18751.12,8477.26 r0 top (schematic designator LED21)
LED21_LED7 "WS2812B-B/W" WS2812B-B/W 9943.31,4483.56 r0 top (schematic designator LED21)
LED21_LED8 "WS2812B-B/W" WS2812B-B/W 7885.12,10937.26 r0 top (schematic designator LED21)
LED21_LED9 "WS2812B-B/W" WS2812B-B/W 8670.12,9066.26 r0 top (schematic designator LED21)
LED189 "WS2812B-B/W" WS2812B-B/W 8431.12,9700.26 r0 top
LED224 "RED" LED-0603 26510.26,74.35 r270 bottom
Q1 "S8050" SOT-23 26556.63,423.6 r270 bottom
Q2 "Si2302CDS" Sot-23 26723.12,1214.26 r270 bottom
R1 "10K" Res-0402 27350.12,191.26 r180 bottom
R2 "10K" Res-0402 25927.62,879.26 r0 bottom
R3 "10K" Res-0402 25999.62,879.26 r0 bottom
R4 "560R" Res-0402 26640.12,479.76 r270 bottom
R5 "10K" Res-0402 26813.12,1195.76 r90 bottom
R6 "10K" Res-0402 26702.62,1300.26 r0 bottom
R7 "10K" Res-0402 26624.12,533.76 r180 bottom
R8 "1K" Res-0603 26632.12,1184.26 r270 bottom
R9 "10K" Res-0402 26865.12,1190.26 r90 bottom
R10 "2.2R" Res-0603 26468.12,453.76 r90 bottom
R11 "51K" Res-0603 23676.12,241.26 r270 bottom value=51kR
R12 "10K" Res-0402 23631.12,252.76 r90 bottom
R13 "0R" Res-0603 24133.12,1026.26 r90 bottom
R14 "73.2K" Res-0603 24053.12,400.26 r180 bottom value=73.2kR
R15 "3.01R" Res-1206 24355.12,694.26 r90 bottom
R16 "10K" Res-0402 24101.62,447.26 r180 bottom
R17 "150K" Res-0603 24161.12,415.26 r90 bottom value=150kR
R18 "53.6K" Res-0603 24032.12,572.26 r180 bottom value=53.6kR
R19 "150K" Res-0603 24110.12,758.26 r270 bottom value=150kR
R20 "1K" Res-0603 26449,68 r90 bottom
R21 "249K" Res-0402 24051.12,788.26 r0 bottom
R22 "44.2K" Res-0603 24033.12,726.26 r0 bottom
R23 "10K" Res-0402 7150,1792.5 r270 bottom
SW1 "B3U-1000P" B3U-1000P 27401.41,115.81 r180 bottom
SW2 "B3U-1000P" B3U-1000P 27112.84,114.71 r0 bottom
SW3 "MT-0-102-C003-N003-RS" MT-0-102-C003-N003-RS* 25944.73,537.69 r180 bottom
SW4 "SS-3235D-03-L2" SS-3235D-03-L2_ 23425,252 r180 bottom
U1 "ESP32-WROOM-32E-N16" "38-SMD Module" 27065.09,769.68 r90 bottom
U2 "HUSB237-AA001-DN06R" DFN-6L-EP(2x2) 24945.12,284.26 r270 bottom
U3 "AZ1117CH-3.3TRG1" "SOT- 223" 26474.5,958.58 r90 bottom
U4 "TPS548A20RVER" VQFN-CLIP-28-EP(3.5x4.5)* 24192.37,588.52 r270 bottom

## Footprints (in the part's own frame and the unit in brackets; to place one, negate y for a bottom-side part, rotate by r counter-clockwise, add the part's x,y. Pads: shape width x height; smd on the part's side, far side on the other; paste and mask are expansions set on the pad)
"38-SMD Module" [mm]
  rect 1.5x0.9 smd: 1(-8.75,8.88) 2(-8.75,7.61) 3(-8.75,6.34) 4(-8.75,5.07) 5(-8.75,3.8) 6(-8.75,2.53) 7(-8.75,1.26) 8(-8.75,-0.01) 9(-8.75,-1.28) 10(-8.75,-2.55) 11(-8.75,-3.82) 12(-8.75,-5.09) 13(-8.75,-6.36) 14(-8.75,-7.63) 25(8.75,-7.63) 26(8.75,-6.36) 27(8.75,-5.09) 28(8.75,-3.82) 29(8.75,-2.55) 30(8.75,-1.28) 31(8.75,-0.01) 32(8.75,1.26) 33(8.75,2.53) 34(8.75,3.8) 35(8.75,5.07) 36(8.75,6.34) 37(8.75,7.61) 38(8.75,8.88)
  rect 0.9x1.5 smd: 15(-5.71,-8.88) 16(-4.44,-8.88) 17(-3.17,-8.88) 18(-1.9,-8.88) 19(-0.63,-8.88) 20(0.64,-8.88) 21(1.91,-8.88) 22(3.18,-8.88) 23(4.45,-8.88) 24(5.72,-8.88)
  rect 0.9x0.9 smd: 39(-2.65,2.56) 40(-1.25,2.56) 41(0.15,2.56) 42(-2.65,1.16) 43(-1.25,1.16) 44(0.15,1.16) 45(-2.65,-0.24) 46(-1.25,-0.24) 47(0.15,-0.24)
  round 0.6 hole 0.3 mask+0: 39_10(-1.95,2.56) 39_11(-0.55,2.56) 39_12(-2.65,1.86) 39_13(-1.25,1.86) 39_14(0.15,1.86) 39_15(-1.95,1.16) 39_16(-0.55,1.16) 39_17(-2.65,0.46) 39_18(-1.25,0.46) 39_19(0.15,0.46) 39_20(-1.95,-0.24) 39_21(-0.55,-0.24)
  Keep-Out Layer region: -9.043,16.383 9.042,16.383 9.042,10.287 -9.043,10.287
  silkscreen extent -9.8,-9.22 9.09,16.43, body extent -9,-9.12 9,16.38, height 3.25
AFC24-S40FIC-00 [mm]
  rect 0.3x1.2 smd: 1(-9.75,1.61) 2(-9.25,1.61) 3(-8.75,1.61) 4(-8.25,1.61) 5(-7.75,1.61) 6(-7.25,1.61) 7(-6.75,1.61) 8(-6.25,1.61) 9(-5.75,1.61) 10(-5.25,1.61) 11(-4.75,1.61) 12(-4.25,1.61) 13(-3.75,1.61) 14(-3.25,1.61) 15(-2.75,1.61) 16(-2.25,1.61) 17(-1.75,1.61) 18(-1.25,1.61) 19(-0.75,1.61) 20(-0.25,1.61) 21(0.25,1.61) 22(0.75,1.61) 23(1.25,1.61) 24(1.75,1.61) 25(2.25,1.61) 26(2.75,1.61) 27(3.25,1.61) 28(3.75,1.61) 29(4.25,1.61) 30(4.75,1.61) 31(5.25,1.61) 32(5.75,1.61) 33(6.25,1.61) 34(6.75,1.61) 35(7.25,1.61) 36(7.75,1.61) 37(8.25,1.61) 38(8.75,1.61) 39(9.25,1.61) 40(9.75,1.61)
  rect 2.2x2 smd: MP1(-11.35,-1.61) MP2(11.35,-1.61)
  silkscreen extent -11.81,-3.72 11.81,2.15, body extent -11.8,-3.68 11.8,2.12, height 2.01
B3U-1000P [mm] "SWITCH TACTILE SPST-NO 0.05A 12V"
  rect 0.82x1.72 smd: 1(-1.7,0) 2(1.7,0)
  silkscreen extent -1.57,-1.3 1.57,1.3, body extent -2,-1.26 2,1.24, height 1.6
BCIH1367-2R2M [mm]
  rect 3.25x5 smd: 1(-5.625,0) 2(5.625,0)
  silkscreen extent -6.7,-6.3 6.7,6.3, body extent -6.74,-6.3 6.66,6.3, height 6.7
Cap-0402 [mil]
  rect 18x25 smd mask+2.36: 1(-18.5,0) 2(18.5,0)
  silkscreen extent -31,-16 31,16, body extent -20,-10 20,10, height 19
Cap-0603 [mil]
  rect 30x35 smd mask+2.36: 1(-30,0) 2(30,0)
  silkscreen extent -49,-21 49,21, body extent -32,-16 31,16, height 34
CAP-0603 [mil]
  rect 30x35 smd mask+2.36: 1(-30,0) 2(30,0)
  silkscreen extent -49,-21 49,21, body extent -32,-16 31,16, height 34
Cap-0805 [mil] "SMD 0805"
  rect 40x60 smd mask+2.76: 1(-40,0) 2(40,0)
  silkscreen extent -64,-34 64,34, body extent -39,-25 39,25, height 30
Case-C [mm]
  rect 2.4x3 smd: 1(-2.7,0) 2(2.7,0)
  silkscreen extent -4.8,-1.75 3.05,1.75, body extent -3.1,-1.67 3.1,1.68, height 2.46
DFN-6L-EP(2x2) [mm]
  rect 0.5x0.35 smd paste+0 mask+0.051: 1(-1,0.65) 2(-1,0) 3(-1,-0.65) 4(1,-0.65) 5(1,0) 6(1,0.65)
  rect 1x1.6 smd paste+0 mask+0.051: 7(0,0)
  silkscreen extent -1.52,-1.05 1,1.05, body extent -1.01,-1 1.01,1, height 0.82
Fuse-0603 [mm]
  rect 1x1 smd: 1(-0.85,0) 2(0.85,0)
  silkscreen extent -0.25,-0.48 0.25,0.48, body extent -0.77,-0.42 0.78,0.43, height 0.45
LED-0603 [mm]
  rect 0.5x1 smd: 1(-0.75,0) 2(0.75,0)
  silkscreen extent -1.12,-0.66 1.75,0.66, body extent -0.82,-0.37 0.82,0.36, height 0.68
MT-0-102-C003-N003-RS* [mm]
  round 3 hole 1.9: 1(4.7,6.35) 2(0,6.35) 3(-4.7,6.35) 4(-2.5,-6.35) 5(2.5,-6.35)
  silkscreen extent -6.55,-20.34 6.55,3.75, body extent -6.55,-20.6 6.55,6.95, height 8.1
Res-0402 [mil]
  rect 18x25 smd mask+2.17: 1(-18.5,0) 2(18.5,0)
  silkscreen extent -32,-17 32,16, body extent -23,-11 23,11, height 16
Res-0603 [mil]
  rect 30x35 smd: 1(-30,0) 2(30,0)
  silkscreen extent -48,-21 48,21, body extent -31,-17 31,17, height 18
Res-1206 [mil]
  rect 60x70 smd: 1(-50,0) 2(50,0)
  silkscreen extent -84,-39 84,39, body extent -63,-31 63,31, height 24
"SMA Bi Directional" [mm]
  rect 2x1.8 smd paste+0 mask+0.051: 1(-2,0) 2(2,0)
  silkscreen extent -2.3,-1.4 2.3,1.4, body extent -2.6,-1.3 2.6,1.3, height 2.4
"SOD-523 (Bi-Directional)" [mm]
  rect 0.6x0.4 smd: 1(-0.75,0) 2(0.75,0)
  silkscreen extent -0.65,-0.5 0.65,0.5, body extent -0.8,-0.4 0.8,0.4, height 0.7
SOT-23 [mm] "TRANS NPN 40V 0.6A SOT23"
  rect 0.82x0.92 smd: 1(-0.95,-1) 2(0.95,-1) 3(0,1)
  silkscreen extent -1.68,-1.3 1.55,0.81, body extent -1.5,-1.25 1.5,1.25, height 1.05
Sot-23 [mm] "TRANS NPN 40V 0.6A SOT23"
  rect 0.82x0.92 smd: 1(-0.95,-1) 2(0.95,-1) 3(0,1)
  silkscreen extent -1.68,-1.3 1.55,0.81, body extent -1.5,-1.25 1.5,1.25, height 1.05
"SOT- 223" [mm]
  rect 1.5x2 smd: 1(-2.3,-3.05) 2(0,-3.05) 3(2.3,-3.05)
  rect 3.8x2 smd: 4(0,3.05)
  silkscreen extent -3.35,-3.2 3.3,1.8, body extent -3.25,-3.5 3.25,3.5, height 1.61
SS-3235D-03-L2_ [mm]
  rect 1.2x1.6 smd: 1(-2.5,-2.85) 3(2.5,-2.85)
  rect 1.21x1.6 smd: 2(0,2.85)
  silkscreen extent -4.53,-2.97 4.54,1.75, body extent -4.5,-3.45 4.55,3.45, height 6.4
TYPE-C-31-M-12_ [mm]
  rect 0.6x1.2 smd: A1/B12(-3.2,2.375) A4/B9(-2.4,2.375) B1/A12(3.2,2.375) B4/A9(2.4,2.375)
  rect 0.3x1.2 smd: A5(-1.25,2.375) A6(-0.25,2.375) A7(0.25,2.375) A8(1.25,2.375) B5(1.75,2.375) B6(0.75,2.375) B7(-0.75,2.375) B8(-1.75,2.375)
  round 0 hole 0.62 unplated: MH(-2.89,1.305) MH(2.89,1.305)
  oval 0.9x2 hole 0.6 slot 1.7 at 90 deg: S1(4.325,1.805) S4(-4.325,1.805)
  oval 0.9x1.7 hole 0.6 slot 1.4 at 90 deg: S2(4.325,-2.375) S3(-4.325,-2.375)
  silkscreen extent -4.5,-3.57 4.5,0.44, body extent -4.47,-5.01 4.47,2.89, height 3.31
"Voltlink Target" [mm]
  rect 0.5x1.6 smd: 1(-2.5,-1.262) 2(-1.5,-1.262) 3(-0.5,-1.262) 4(0.5,-1.262) 5(1.5,-1.262) 6(2.5,-1.262)
  rect 1.2x1.8 smd: MP1(-3.8,1.262) MP2(3.8,1.262)
  silkscreen extent -4.06,-1.68 4.06,2.17, body extent -4,-1.49 4,2.11, height 4.25
VQFN-CLIP-28-EP(3.5x4.5)* [mm]
  rect 0.665x0.224 smd paste-100 mask+0.05: 1(-1.658,1.6) 2(-1.658,1.2) 3(-1.658,0.8) 4(-1.658,0.4) 5(-1.658,0) 6(-1.658,-0.4) 7(-1.658,-0.8) 8(-1.658,-1.2) 9(-1.658,-1.6) 15(1.658,-1.6) 16(1.658,-1.2) 17(1.658,-0.8) 18(1.658,-0.4) 19(1.658,0) 20(1.658,0.4) 21(1.658,0.8) 22(1.658,1.2) 23(1.658,1.6)
  rect 0.224x0.665 smd paste-100 mask+0.05: 10(-0.8,-2.157) 11(-0.4,-2.157) 12(0,-2.157) 13(0.4,-2.157) 14(0.8,-2.157) 24(0.8,2.157) 25(0.4,2.157) 26(0,2.157) 27(-0.4,2.157) 28(-0.8,2.157)
  rect 2.1x3.1 smd paste-100 mask+0.05: 29(0,0)
  silkscreen extent -2.27,-2.3 1.8,2.3, body extent -1.75,-2.25 1.75,2.25, height 1
WS2812B-B/W [mm]
  rect 1.5x1 smd: 1(-2.5,1.65) 2(-2.5,-1.65) 3(2.5,-1.65) 4(2.5,1.65)
  silkscreen extent -3.56,-2.55 2.5,2.55, body extent -2.7,-2.5 2.7,2.5, height 1.55

## Part data
C1 C5 C9 C11 C25 C26 C27: library part GRM188R61E106KA73D, "CAP CER 10UF 25V X5R 0603", Case/Package=0603, LCSC Part Number=C344022, Manufacturer=Murata, Supplier Part Number 1=81-GRM188R61E106KA3D, Category="Ceramic Capacitors", ComponentLink1Description=https://search.murata.co.jp/Ceramy/image/img/A01X/G101/ENG/GRM188R61E106KA73-01.pdf?src-supplier=Digi-Key, ComponentLink1URL=https://search.murata.co.jp/Ceramy/image/img/A01X/G101/ENG/GRM188R61E106KA73-01.pdf?src-supplier=Digi-Key, Manufacturer Part Number=GRM188R61E106KA73D, Pricing 1="1=0.36000, 10=0.25800, 50=0.25800, 100=0.15500, 1000=0.09800, 10000=0.06900 (USD)", RoHS=Yes, RoHS Compliant=Yes, Stock 1=319428, Supplier 1=Mouser
C2 C3 C4 C10 C19: library part CC0402KRX5R7BB104, "CAP CER 0.1UF 16V X5R 0402", Case Code (Imperial)=0402, Case Code (Metric)=1005, Dielectric=X5R, LCSC Part Number=C106204, Manufacturer=Yageo, Max Operating Temperature=85°C, Min Operating Temperature=-55°C, Package Quantity=1, Resistor Type=Ceramic, Supplier Part Number 1=603-CC402KRX5R7BB104, Tolerance=10%, Voltage Rating=16V, Capacitance=100nF, Case/Package=0402, Category="Ceramic Capacitors", ComponentLink1Description=https://datasheet.ciiva.com/155/mlccorderingcode-155879.pdf?src-supplier=Digi-Key, ComponentLink1URL=https://datasheet.ciiva.com/155/mlccorderingcode-155879.pdf?src-supplier=Digi-Key, ComponentLink2Description=https://datasheet.ciiva.com/155/mlccorderingcode-155878.pdf?src-supplier=Digi-Key, ComponentLink2URL=https://datasheet.ciiva.com/155/mlccorderingcode-155878.pdf?src-supplier=Digi-Key, ComponentLink3Description=https://datasheet.ciiva.com/155/mlccorderingcode-155880.pdf?src-supplier=Digi-Key, ComponentLink3URL=https://datasheet.ciiva.com/155/mlccorderingcode-155880.pdf?src-supplier=Digi-Key, ComponentLink4Description=https://datasheet.ciiva.com/11464/upy-gphc-x5r-4v-to-50v-12-11464869.pdf?src-supplier=Avnet, ComponentLink4URL=https://datasheet.ciiva.com/11464/upy-gphc-x5r-4v-to-50v-12-11464869.pdf?src-supplier=Avnet, Construction=Flat, Depth=0.5mm, Halogen Free="Halogen Free", Height=0.5mm, Lead Free="Lead Free", Length=1mm, Manufacturer Part Number=CC0402KRX5R7BB104, Mount="Surface Mount", Number of Pins=2, Packaging="Tape and Reel", Pricing 1="1=0.10000, 10=0.02300, 50=0.02300, 100=0.01100, 1000=0.00600, 10000=0.00400 (USD)", Radiation Hardening=No, REACH SVHC=Unknown, RoHS=Yes, RoHS Compliant=Yes, Series=CC, Stock 1=936792, Supplier 1=Mouser, Termination=SMD/SMT, Thickness=0.022inch, Voltage Rating (DC)=16V, Width=0.02inch
C6: library part CGA0603X7R203K500JT, "50V 20nF X7R ±10% 0603 Multilayer Ceramic Capacitors MLCC - SMD/SMT ROHS", LCSC Part Number=C36911410, Manufacturer=HRE, ComponentLink1Description=LCSC, ComponentLink1URL=https://www.lcsc.com/product-detail/Multilayer-Ceramic-Capacitors-MLCC-SMD-SMT_HRE-CGA0603X7R203K500JT_C36911410.html, Item Type=Capacitor, Manufacturer Part Number=CGA0603X7R203K500JT
C7: library part CL10A105KA8NNNC, "CAP CER 1UF 25V X5R 0603", Case/Package=0603, Dielectric=X5R, LCSC Part Number=C5673, Manufacturer=Sams, Max Operating Temperature=85°C, Min Operating Temperature=-55°C, Supplier Part Number 1=1276-1102-1-ND, Tolerance=10%, Voltage=25V, Capacitance=1uF, Depth=0.8mm, Height=0.8mm, Lead Free="Lead Free", Length=1.6mm, Manufacturer Part Number=CL10A105KA8NNNC, Mount="Surface Mount", Pricing 1="1=0.1, 10=0.036, 50=0.0198, 100=0.0161, 500=0.01152, 1000=0.00904 (USD)", Stock 1=2768758, Supplier 1=Digi-Key, Voltage Rating (DC)=25V
C12 C13 C14 C15 C16: library part C2012X5R1V226MT000E, "CAP CER 22UF 35V X5R 0805", LCSC Part Number=C338080, Manufacturer="TDK Corporation", Package=0805, ComponentLink1Description=LCSC, ComponentLink1URL=https://www.lcsc.com/product-detail/Multilayer-Ceramic-Capacitors-MLCC-SMD-SMT_TDK-C2012X5R1V226M125AC_C2179409.html, Item Type=Capacitor, Manufacturer Part Number=C2012X5R1V226MT000E
C17: library part 04025C222JAT2A, "CAP CER 2.2nF 50V X7R ±5% 0402 MLCC - SMD/SMT ROHS", LCSC Part Number=C597041, Manufacturer="Kyocera AVX", Package=0402, ComponentLink1Description=LCSC, ComponentLink1URL=https://www.lcsc.com/product-detail/Multilayer-Ceramic-Capacitors-MLCC-SMD-SMT_Kyocera-AVX-04025C222JAT2A_C597041.html, Item Type=Capacitor, Manufacturer Part Number=04025C222JAT2A
C18 C29: library part CC0603KRX5R8BB225, "CAP CER 2.2UF 25V X5R 0603", Case Code (Imperial)=0603, Case Code (Metric)=1608, Dielectric=X5R, LCSC Part Number=C309478, Manufacturer=Yageo, Max Operating Temperature=85°C, Min Operating Temperature=-55°C, Package Quantity=4000, Resistor Type=Ceramic, Supplier Part Number 1=311-1786-1-ND, Tolerance=10%, Voltage Rating=25V, Capacitance=2.2uF, Case/Package=0603, ComponentLink1Description=https://www.verical.com/server-webapp/html/getDatasheet?partID=782757&src-supplier=Verical, ComponentLink1URL=https://www.verical.com/server-webapp/html/getDatasheet?partID=782757&src-supplier=Verical, Depth=0.8mm, Halogen Free="Halogen Free", Item Type=Capacitor, Lead Free="Lead Free", Length=1.6mm, Manufacturer Part Number=CC0603KRX5R8BB225, Mount="Surface Mount", Packaging="Tape and Reel", Pricing 1="1=0.4, 10=0.276, 50=0.1932, 100=0.1656, 500=0.1242, 1000=0.10488 (USD)", Radiation Hardening=No, RoHS Compliant=Yes, Stock 1=687936, Supplier 1=Digi-Key, Termination=SMD/SMT, Thickness=0.037inch, Voltage Rating (DC)=25V, Weight=7.1E-05oz, Width=0.031inch
C20 C21 C22 C23 C24: library part TAJC686K016RNJ, "CAP TANT 68UF 10% 16V 2312", Case Code (Imperial)=2312, Case Code (Metric)=6032, Case/Package=Molded, Dielectric Material=Tantalum, ESR (Equivalent Series Resistance)=1.3R, LCSC Part Number=C7220, Leakage Current=10.9uA, Manufacturer="Kyocera AVX", Max Operating Temperature=125°C, Min Operating Temperature=-55°C, Package Quantity=1, Tolerance=10%, Voltage=16V, Voltage Rating (DC)=16.3V, ComponentLink1Description=https://datasheet.ciiva.com/11794/0900766b802e69d0-11794413.pdf?src-supplier=Rs, ComponentLink1URL=https://datasheet.ciiva.com/11794/0900766b802e69d0-11794413.pdf?src-supplier=Rs, ComponentLink2Description=https://datasheet.ciiva.com/7864/1680476-7864538.pdf?src-supplier=Element14, ComponentLink2URL=https://datasheet.ciiva.com/7864/1680476-7864538.pdf?src-supplier=Element14, ComponentLink3Description=https://datasheet.ciiva.com/7864/1680476-7864539.pdf?src-supplier=Element14, ComponentLink3URL=https://datasheet.ciiva.com/7864/1680476-7864539.pdf?src-supplier=Element14, ComponentLink4Description=https://datasheet.ciiva.com/7864/1680476-7864537.pdf?src-supplier=Element14, ComponentLink4URL=https://datasheet.ciiva.com/7864/1680476-7864537.pdf?src-supplier=Element14, ComponentLink5Description=https://datasheet.ciiva.com/28577/taj-28577855.pdf?src-supplier=Element14, ComponentLink5URL=https://datasheet.ciiva.com/28577/taj-28577855.pdf?src-supplier=Element14, ComponentLink6Description=https://datasheet.ciiva.com/264/taj-264443.pdf?src-supplier=Digikey, ComponentLink6URL=https://datasheet.ciiva.com/264/taj-264443.pdf?src-supplier=Digikey, ComponentLink7Description=https://datasheet.ciiva.com/264/taj-264442.pdf?src-supplier=Digikey, ComponentLink7URL=https://datasheet.ciiva.com/264/taj-264442.pdf?src-supplier=Digikey, ComponentLink8Description=https://datasheet.ciiva.com/264/taj-264444.pdf?src-supplier=Digikey, ComponentLink8URL=https://datasheet.ciiva.com/264/taj-264444.pdf?src-supplier=Digikey, ComponentLink9Description=https://datasheet.ciiva.com/12883/taj-27497-12883640.pdf?src-supplier=Mouser, ComponentLink9URL=https://datasheet.ciiva.com/12883/taj-27497-12883640.pdf?src-supplier=Mouser, ComponentLink10Description=https://datasheet.ciiva.com/11225/taj-11225965.pdf?src-supplier=Avnet, ComponentLink10URL=https://datasheet.ciiva.com/11225/taj-11225965.pdf?src-supplier=Avnet, ComponentLink11Description=https://datasheet.ciiva.com/16298/taj-16298458.pdf?src-supplier=Future+Electronics, ComponentLink11URL=https://datasheet.ciiva.com/16298/taj-16298458.pdf?src-supplier=Future+Electronics, ComponentLink12Description=https://datasheet.ciiva.com/15163/getdatasheetpartid-41779-15163003.pdf?src-supplier=Verical, ComponentLink12URL=https://datasheet.ciiva.com/15163/getdatasheetpartid-41779-15163003.pdf?src-supplier=Verical, Depth=3.2mm, Dissipation Factor=6%, Features="General Purpose", Height=2.6mm, Height - Seated (Max)=0.11inch, Item Type=Capacitors, Lead Free="Lead Free", Length=6mm, Manufacturer Part Number=TAJC686K016RNJ, Mounting Technology="Surface Mount", Packaging="Tape and Reel", Pins=2, Polarity=Polar, Pricing="1=1.06, 10=0.729, 50=0.581, 100=0.5317 (USD)", Radiation Hardening=No, Reach SVHC Compliant=No, RoHS=Yes, RoHS Compliant=Yes, Series=TAJ, Stock=888, Supplier=Digikey, Termination=SMD/SMT, Voltage Rating=16V, Width=3.2mm
C28: library part CC0603KPX7R9BB471, "CAP CER 470PF 50V X7R 0603", Case Code (Imperial)=0603, Case Code (Metric)=1608, Dielectric=X7R, LCSC Part Number=C2184946, Manufacturer=Yageo, Max Operating Temperature=125°C, Min Operating Temperature=-55°C, Resistor Type=Ceramic, Supplier Part Number 1=13-CC0603KPX7R9BB471CT-ND, Tolerance=10%, Voltage Rating (DC)=50V, Capacitance=470pF, Case/Package=0603, Category="Ceramic Capacitors", ComponentLink1Description=https://datasheet.ciiva.com/17436/upy-gphc-x7r-6-3v-to-50v-8-17436926.pdf?src-supplier=Avnet+Europe, ComponentLink1URL=https://datasheet.ciiva.com/17436/upy-gphc-x7r-6-3v-to-50v-8-17436926.pdf?src-supplier=Avnet+Europe, Construction=Flat, Depth=0.8mm, Halogen Free="Halogen Free", Height=0.8mm, Lead Free="Lead Free", Length=1.6mm, Manufacturer Part Number=CC0603KPX7R9BB471, Mount="Surface Mount", Packaging="Tape and Reel", Pricing 1="1=0.10000, 10=0.04700, 50=0.02560, 100=0.02100, 500=0.01498, 1000=0.01176, 2500=0.01070, 5000=0.00984 (USD)", Radiation Hardening=No, RoHS=Yes, RoHS Compliant=Yes, Stock 1=29788, Supplier 1=Digi-Key, Termination=SMD/SMT, Weight=7.1E-05oz
D1: "64.5V 44.4V 40V SMA(DO-214AC) TVS ROHS", LCSC Part Number=C113970, Manufacturer=MDD, Package=SMA(DO-214AC), ComponentLink1Description=LCSC, ComponentLink1URL=https://www.lcsc.com/product-detail/TVS_MDD-Microdiode-Electronics-SMAJ40CA_C113970.html, Item Type="TVS Diode", Manufacturer Part Number=SMAJ40CA
D2 D3 D4: "5A 60W 12V 3.6V 3.3V SOD-523 ESD and Surge Protection (TVS/ESD) ROHS", LCSC Part Number=C502551, Manufacturer="MDD(Microdiode Semiconductor)", Package=SOD-523, ComponentLink1Description=LCSC, ComponentLink1URL=https://www.lcsc.com/product-detail/ESD-and-Surge-Protection-TVS-ESD_MDD-Microdiode-Semiconductor-ESD5Z3-3C_C502551.html, Item Type=(TVS/ESD), Manufacturer Part Number=ESD5Z3.3C
F1: "50A SMD Fuse 3.15A 24V 0603 Disposable fuses ROHS", LCSC Part Number=C163108, Manufacturer="TA-I Tech", Package=0603, ComponentLink1Description=LCSC, ComponentLink1URL=https://www.lcsc.com/product-detail/Disposable-fuses_TA-I-Tech-CF06V2T3R15_C163108.html, Item Type=Fuses, Manufacturer Part Number=CF06V2T3R15
J1: "Flip type 40P Dual-sided contacts / top and bottom connection Horizontal attachment 0.5mm SMD,P=0.5mm,Surface Mount，Right Angle FFC, FPC (Flat Flexible) Connector Assemblies ROHS", LCSC Part Number=C262295, Manufacturer=JUSHUO, ComponentLink1Description=LCSC, ComponentLink1URL=https://www.lcsc.com/product-detail/FFC-FPC-Flat-Flexible-Connector-Assemblies_JUSHUO-AFC24-S40FIC-00_C262295.html, Item Type="FFC/FPC Connector", Manufacturer Part Number=AFC24-S40FIC-00, RoHS=No, Supplier=LCSC
J2: library part C145963, "1x6P SH 1 1mm 6 SMD,P=1mm Wire To Board / Wire To Wire Connector ROHS", Manufacturer=BOOMELE, Package=SMD,P=1mm, ComponentLink1Description=LCSC, ComponentLink1URL=https://www.lcsc.com/product-detail/Wire-To-Board-Wire-To-Wire-Connector_BOOMELE-Boom-Precision-Elec-C145963_C145963.html, Item Type=Connector, LCSC Part Number=C145963, Manufacturer Part Number=C145963
J3: "5A 1 16P Female Type-C SMD USB Connectors ROHS", LCSC Part Number=C165948, Manufacturer="Korean Hroparts Elec", ComponentLink1Description=LCSC, ComponentLink1URL=https://www.lcsc.com/product-detail/USB-Connectors_Korean-Hroparts-Elec-TYPE-C-31-M-12_C165948.html, Item Type="USB Connector", Manufacturer Part Number=TYPE-C-31-M-12
L1: library part BCIH1367-2R2M, "22A 2.2uH ±20% SMD Power Inductors ROHS", LCSC Part Number=C237973, Manufacturer="BC(Bao Cheng Elec)", Package=SMD, ComponentLink1Description=LCSC, ComponentLink1URL=https://www.lcsc.com/product-detail/Power-Inductors_BC-Bao-Cheng-Elec-BCIH1367-2R2M_C237973.html, Item Type=Inductor, Manufacturer Part Number=BCIH1367-2R2M
LED1_LED1 LED1_LED2 LED1_LED3 LED1_LED4 LED1_LED5 LED1_LED6 LED1_LED7 LED1_LED8 LED1_LED9 LED2_LED1 LED2_LED2 LED2_LED3 LED2_LED4 LED2_LED5 LED2_LED6 LED2_LED7 LED2_LED8 LED2_LED9 LED3_LED1 LED3_LED2 LED3_LED3 LED3_LED4 LED3_LED5 LED3_LED6 LED3_LED7 LED3_LED8 LED3_LED9 LED4_LED1 LED4_LED2 LED4_LED3 LED4_LED4 LED4_LED5 LED4_LED6 LED4_LED7 LED4_LED8 LED4_LED9 LED5_LED1 LED5_LED2 LED5_LED3 LED5_LED4 LED5_LED5 LED5_LED6 LED5_LED7 LED5_LED8 LED5_LED9 LED6_LED1 LED6_LED2 LED6_LED3 LED6_LED4 LED6_LED5 LED6_LED6 LED6_LED7 LED6_LED8 LED6_LED9 LED7_LED1 LED7_LED2 LED7_LED3 LED7_LED4 LED7_LED5 LED7_LED6 LED7_LED7 LED7_LED8 LED7_LED9 LED8_LED1 LED8_LED2 LED8_LED3 LED8_LED4 LED8_LED5 LED8_LED6 LED8_LED7 LED8_LED8 LED8_LED9 LED9_LED1 LED9_LED2 LED9_LED3 LED9_LED4 LED9_LED5 LED9_LED6 LED9_LED7 LED9_LED8 LED9_LED9 LED10_LED1 LED10_LED2 LED10_LED3 LED10_LED4 LED10_LED5 LED10_LED6 LED10_LED7 LED10_LED8 LED10_LED9 LED11_LED1 LED11_LED2 LED11_LED3 LED11_LED4 LED11_LED5 LED11_LED6 LED11_LED7 LED11_LED8 LED11_LED9 LED12_LED1 LED12_LED2 LED12_LED3 LED12_LED4 LED12_LED5 LED12_LED6 LED12_LED7 LED12_LED8 LED12_LED9 LED13_LED1 LED13_LED2 LED13_LED3 LED13_LED4 LED13_LED5 LED13_LED6 LED13_LED7 LED13_LED8 LED13_LED9 LED14_LED1 LED14_LED2 LED14_LED3 LED14_LED4 LED14_LED5 LED14_LED6 LED14_LED7 LED14_LED8 LED14_LED9 LED15_LED1 LED15_LED2 LED15_LED3 LED15_LED4 LED15_LED5 LED15_LED6 LED15_LED7 LED15_LED8 LED15_LED9 LED16_LED1 LED16_LED2 LED16_LED3 LED16_LED4 LED16_LED5 LED16_LED6 LED16_LED7 LED16_LED8 LED16_LED9 LED17_LED1 LED17_LED2 LED17_LED3 LED17_LED4 LED17_LED5 LED17_LED6 LED17_LED7 LED17_LED8 LED17_LED9 LED18_LED1 LED18_LED2 LED18_LED3 LED18_LED4 LED18_LED5 LED18_LED6 LED18_LED7 LED18_LED8 LED18_LED9 LED19_LED1 LED19_LED2 LED19_LED3 LED19_LED4 LED19_LED5 LED19_LED6 LED19_LED7 LED19_LED8 LED19_LED9 LED20_LED1 LED20_LED2 LED20_LED3 LED20_LED4 LED20_LED5 LED20_LED6 LED20_LED7 LED20_LED8 LED20_LED9 LED21_LED1 LED21_LED2 LED21_LED3 LED21_LED4 LED21_LED5 LED21_LED6 LED21_LED7 LED21_LED8 LED21_LED9 LED189: "RGB SMD5050 Light Emitting Diodes (LED) ROHS", LCSC Part Number=C114586, Manufacturer=Worldsemi, Package=SMD5050, ComponentLink1Description=LCSC, ComponentLink1URL=https://www.lcsc.com/product-detail/Light-Emitting-Diodes-LED_Worldsemi-WS2812B-B-W_C114586.html, Item Type="RGB LED", Manufacturer Part Number=WS2812B-B/W
LED224: library part NCD0603R3, "RED LED 0603 Light Emitting Diodes", LCSC Part Number=C3151730, Manufacturer="Foshan NationStar Optoelectronics", Package=0603, ComponentLink1Description=LCSC, ComponentLink1URL=https://www.lcsc.com/product-detail/Light-Emitting-Diodes-LED_Foshan-NationStar-Optoelectronics-NCD0603R3_C3151730.html, Item Type=LED, Manufacturer Part Number=NCD0603R3
Q1: "Trans Gp Bjt NPN 25V 1.5A 300MW 3-PIN SOT-23 T/r", Case/Package=TO-236-3, Collector Emitter Breakdown Voltage=25V, Collector Emitter Voltage (VCEO)=400mV, LCSC Part Number=C105433, Manufacturer=Comchip, Manufacturer Part Number=SS8050-G, Max Collector Current=1.5A, Max Power Dissipation=300mW, Transition Frequency=100MHz, ComponentLink1Description="http://www.comchiptech.com/admin/files/product/SS8050-G RevA181526.pdf?src-supplier=Digi-Key", ComponentLink1URL="http://www.comchiptech.com/admin/files/product/SS8050-G RevA181526.pdf?src-supplier=Digi-Key", ComponentLink2Description=http://www.comchiptech.com/cms/UserFiles/SS8050-G%20RevA181526.pdf?src-supplier=Digi-Key, ComponentLink2URL=http://www.comchiptech.com/cms/UserFiles/SS8050-G%20RevA181526.pdf?src-supplier=Digi-Key, Item Type=Transistor, Max Breakdown Voltage=25V, Mount="Surface Mount", Packaging="Tape and Reel", Pricing 1="1=0.26480, 10=0.19960, 25=0.19760, 50=0.19590, 100=0.09990, 250=0.09890, 500=0.07670, 1000=0.05180 (USD)", RoHS=Yes, Stock 1=2514, Supplier 1="Arrow Electronics", Supplier Part Number 1=SS8050-G